# Altium PCB Driver_10kW.PcbDoc (part 1 of 2)
Units mm, origin at the board's own origin, x right, y up, seen from the top; angles counter-clockwise.
Board outline 425.08 x 200.2 mm, 2 copper layers (Top Layer, Bottom Layer); 139 components, 65 nets, 350 pads, 391 vias.
Unrouted connection lines stored in the file: 4.
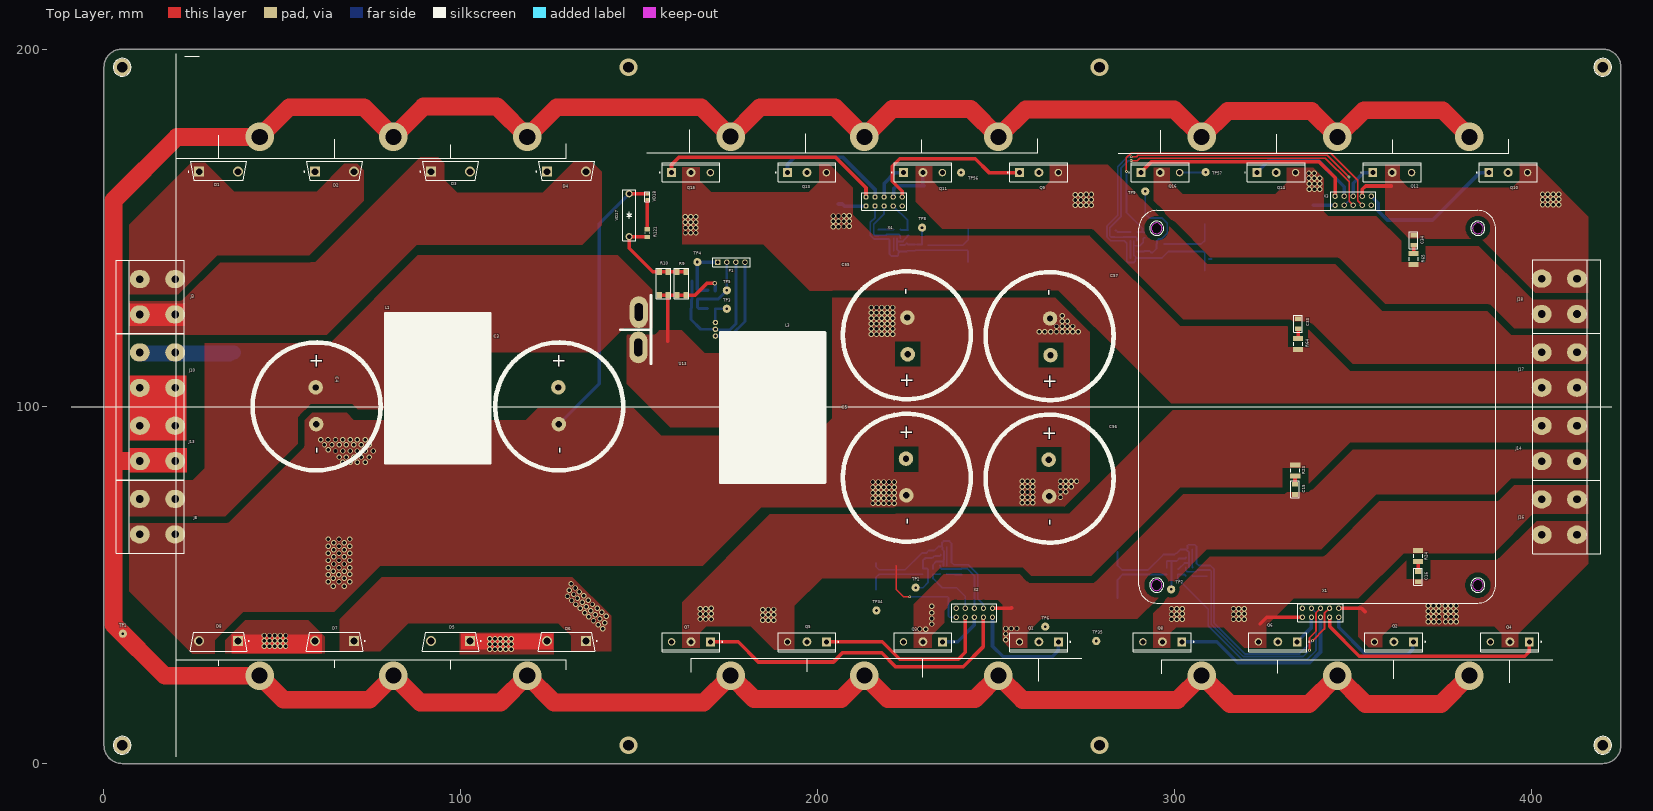
[diagram p0: Top Layer view]
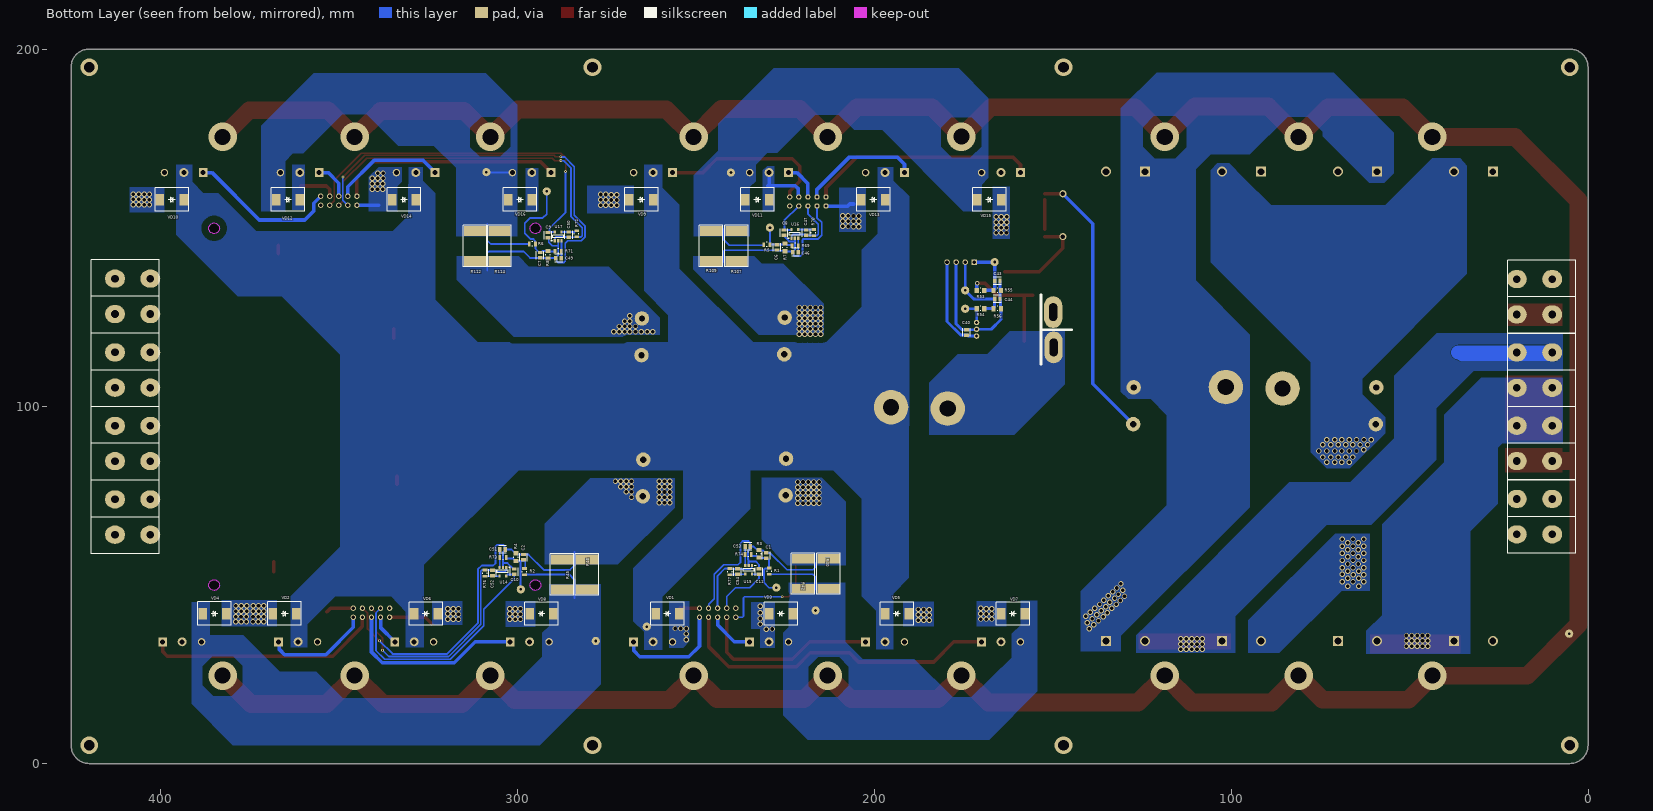
[diagram p1: Bottom Layer view, seen from below]
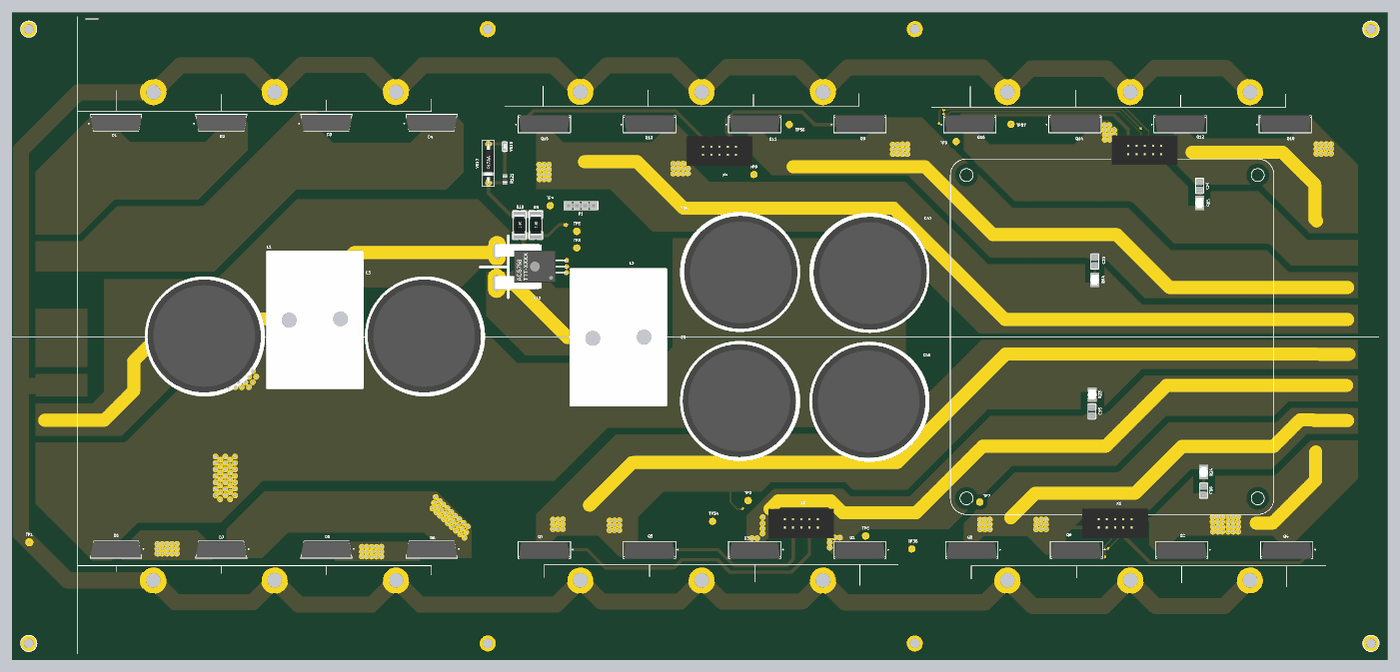
[diagram p3: 3D render of the assembled board from above, using the file's embedded part models]
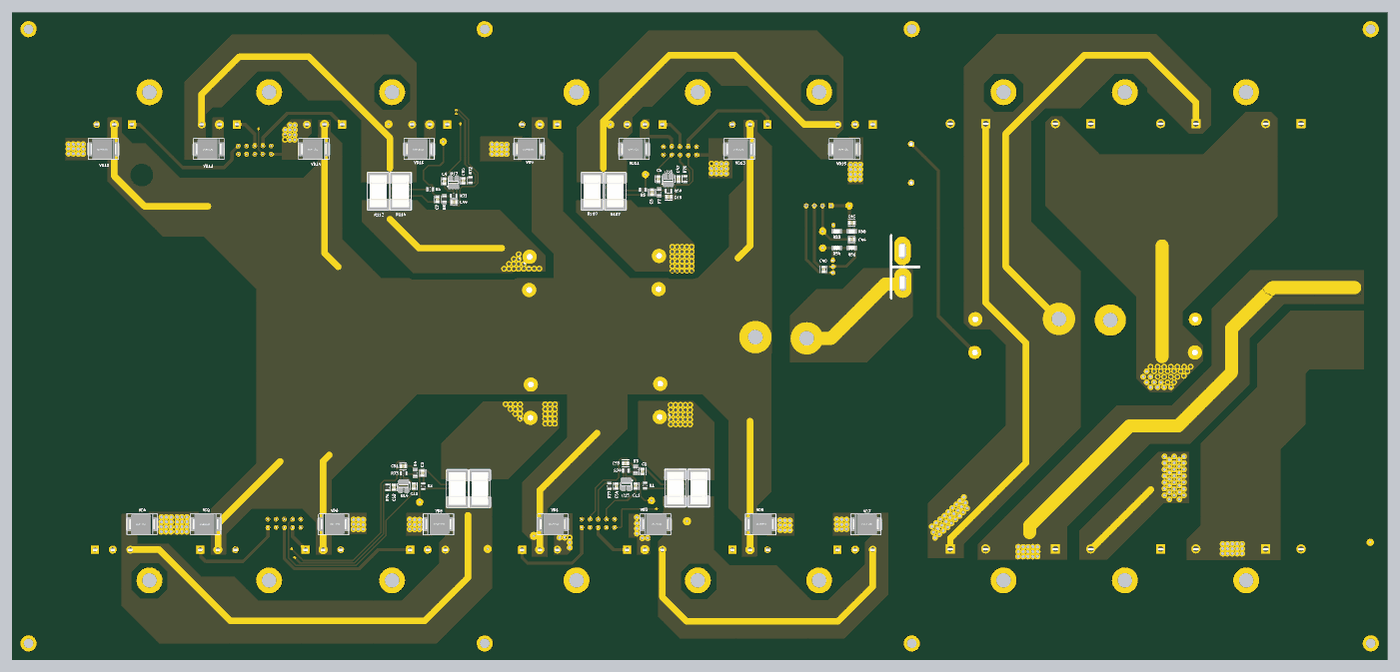
[diagram p4: 3D render of the assembled board from below, using the file's embedded part models]

## Layer stack, top to bottom
Top Solder: solder mask 0.0102, Solder Resist, Dk 3.5
Top Layer: signal copper 0.0356
Dielectric 1: dielectric 0.32, FR-4, Dk 4.8
Bottom Layer: signal copper 0.0356
Bottom Solder: solder mask 0.0102, Solder Resist, Dk 3.5

## Board outline
0.025,5.125 cw(c0.125,5.125) 0.026,5.139 cw(c0.125,5.154) 0.025,5.154 0.025,195.125 cw(c0.125,195.125) 0.025,195.129 cw(c5.125,195.125) 5.096,200.225 cw(c5.1,200.124) 5.1,200.225 5.125,200.225 420.002,200.225 cw(c420.002,200.126) 420.014,200.225 cw(c420.027,200.125) 420.027,200.225 cw(c420,195.125) 425.1,195.125 cw(c425.008,195.125) 425.1,195.122 425.1,5.125 cw(c425.011,5.125) 425.1,5.122 ccw(c423.825,5.124) 425.1,5.125 425.1,5.122 cw(c420,5.125) 420,0.025 cw(c420,0.125) 419.999,0.025 5.128,0.025 cw(c5.125,0.125) 5.125,0.025 cw(c5.125,5.125)
cut-out: 293.5,50 ccw(c295,50) 295,48.5 ccw(c295,50) 296.5,50 ccw(c295,50) 295,51.5 ccw(c295,50)
cut-out: 383.5,50 ccw(c385,50) 385,48.5 ccw(c385,50) 386.5,50 ccw(c385,50) 385,51.5 ccw(c385,50)
cut-out: 383.5,150 ccw(c385,150) 385,148.5 ccw(c385,150) 386.5,150 ccw(c385,150) 385,151.5 ccw(c385,150)
cut-out: 293.5,150 ccw(c295,150) 295,148.5 ccw(c295,150) 296.5,150 ccw(c295,150) 295,151.5 ccw(c295,150)

## Design rules (kind name [scope] priority, off if disabled: settings)
Clearance HV [InNetClass('All Nets') vs InNetClass('HV')] p1: gap=0.4 ignorepadtopadclearanceinfootprint=FALSE except(0: Text-Text Text-Hole; 0.1: Arc-SMDPad Track-SMDPad; 0.2: Arc-Arc Arc-Track Track-Track Via-Via Via-Fill Via-Poly Via-Region Via-Text Via-Hole; 0.3: Arc-THPad Arc-Via Arc-Fill Arc-Poly Arc-Region Arc-Text Arc-Hole Track-THPad Track-Via Track-Fill Track-Poly Track-Region Track-Text Track-Hole; 2: Poly-Poly Poly-Region Poly-Text Poly-Hole)
Clearance Clearance_1 [All] p2: gap=0.1 ignorepadtopadclearanceinfootprint=TRUE except(0.2: SMDPad-SMDPad SMDPad-THPad SMDPad-Via SMDPad-Fill SMDPad-Poly SMDPad-Region SMDPad-Text SMDPad-Hole THPad-THPad THPad-Via THPad-Fill THPad-Poly THPad-Region THPad-Text THPad-Hole; 2: Poly-Poly Poly-Region Poly-Text Poly-Hole)
Clearance GND [InNet('GND')] p3: gap=0.15 ignorepadtopadclearanceinfootprint=TRUE except(0.4: Fill-Fill Fill-Poly Fill-Region Fill-Text Fill-Hole Poly-Poly Poly-Region Poly-Text Poly-Hole Region-Region Region-Text Region-Hole)
ComponentClearance [All] p1: gap=-2.254 collisioncheckmode=3 verticalgap=0.254 showdistances=FALSE
DiffPairsRouting [All] p1: maxlimit=0.254 minlimit=0.1 mostfreqgap=0.254 toplayer_minwidth=0.3 toplayer_maxwidth=2 toplayer_prefwidth=0.3 bottomlayer_minwidth=0.3 bottomlayer_maxwidth=2 bottomlayer_prefwidth=0.3 maxuncoupledlength=12.7
Height [All] p1: minheight=0 maxheight=55.4 prefheight=12.7
HoleSize [All] p1: absolutevalues=TRUE maxlimit=5 minlimit=0.025 maxpercent=80.000 minpercent=20.000
HoleToHoleClearance [All] p1: gap=0 allowstackedmicrovias=TRUE
LayerPairs [All] p1 off: enforce=TRUE
MinimumSolderMaskSliver [All] p1: minsoldermaskwidth=0.01
PasteMaskExpansion [All] p1: expansion=0.5
PlaneClearance [All] p1: clearance=0.1
PlaneConnect [All] p1: planeconnectstyle=Direct reliefexpansion=0.508 reliefentries=4 reliefconductorwidth=0.254 reliefairgap=0.254
PolygonConnect [All] p1: connectstyle=Direct reliefconductorwidth=0.254 reliefentries=4 polygonreliefangle="90 Angle" airgapwidth=0.254
RoutingVias [All] p1: holewidth=0.4 width=0.8 viastyle="Through Hole" minholewidth=0.254 minwidth=0.5 maxholewidth=0.75 maxwidth=1.5
ShortCircuit [All] p1: allowed=TRUE
SilkToSilkClearance [All] p1 off: silktosilkclearance=0.01
SilkToSolderMaskClearance [All] p1: minsilkscreentomaskgap=0 clearancetoexposedcopper=TRUE
SolderMaskExpansion [All] p1: expansion=0.15 istentingtop=FALSE
Width [All] p1: maxlimit=10 minlimit=0.254 preferedwidth=2
17 further rules are at their usual default settings.

## Classes and differential pairs
net class HV: "+350 VDC" NetC15_2 NetC16_2 NetC33_2 NetC34_2 NetJ14_2 NetJ16_2 NetJ17_1 NetJ18_1 NetQ3_3 NetQ4_3 NetQ11_3 NetQ12_3 NetR9_1 V_BAT V_PS

## Components (designator, comment, footprint, x,y, rotation, side; value= is the part's Value field where it differs from the comment)
C1 "C0805C224K5RACTU" FP-C0805C-DN-MFG 230.286,58.327 r90 bottom value="0.22 μF"
C2 "C0805C224K5RACTU" FP-C0805C-DN-MFG 298.293,57.849 r90 bottom value="0.22 μF"
C3 "450V_330uF" CAP_450V_470uF 127.6,100.075 r90 top locked
C4 "450V_330uF" CAP_450V_470uF 59.6,100.075 r90 top locked
C5 "450V_330uF" CAP_450V_470uF 225,80.1 r90 top locked
C6 "C0805C224K5RACTU" FP-C0805C-DN-MFG 227.275,144.677 r270 bottom value="0.22 μF"
C7 "C0805C224K5RACTU" FP-C0805C-DN-MFG 293.65,142.475 r270 bottom value="0.22 μF"
C8 "C0805C224K5RACTU" FP-C0805C-DN-MFG 225.351,148.775 r270 bottom value="0.22 μF"
C9 "C0805C224K5RACTU" FP-C0805C-DN-MFG 291.486,148.075 r270 bottom value="0.22 μF"
C10 "C0805C224K5RACTU" FP-C0805C-DN-MFG 300.925,53.769 r90 bottom value="0.22 μF"
C11 "C0805C224K5RACTU" FP-C0805C-DN-MFG 232.325,53.8 r90 bottom value="0.22 μF"
C15 "CAP-NON-POLAR" CAP-1206 333.775,76.841 r270 top
C16 "CAP-NON-POLAR" CAP-1206 368.275,52.4 r270 top
C33 "CAP-NON-POLAR" CAP-1206 334.65,123.275 r90 top
C34 "CAP-NON-POLAR" CAP-1206 367,146.65 r90 top
C40 "C0805C224K5RACTU" FP-C0805C-DN-MFG 174.201,120.828 r90 bottom value="0.22 μF"
C43 "0.22uF" FP-C0805C-DN-MFG 165.549,135.2 r0 bottom value="0.22 μF"
C44 "0.22uF" FP-C0805C-DN-MFG 165.549,130.15 r0 bottom value="0.22 μF"
C46 "C0805C224K5RACTU" FP-C0805C-DN-MFG 222.089,143.277 r0 bottom value="0.22 μF"
C47 "0.22uF" FP-C0805C-DN-MFG 219.093,148.775 r270 bottom value="0.22 μF"
C49 "C0805C224K5RACTU" FP-C0805C-DN-MFG 288.486,141.626 r0 bottom value="0.22 μF"
C50 "0.22uF" FP-C0805C-DN-MFG 285.627,148.225 r270 bottom value="0.22 μF"
C51 "C0805C224K5RACTU" FP-C0805C-DN-MFG 304.195,60 r180 bottom value="0.22 μF"
C52 "0.22uF" FP-C0805C-DN-MFG 307.044,53.419 r90 bottom value="0.22 μF"
C53 "C0805C224K5RACTU" FP-C0805C-DN-MFG 235.475,60.85 r180 bottom value="0.22 μF"
C54 "0.22uF" FP-C0805C-DN-MFG 238.36,53.8 r90 bottom value="0.22 μF"
C55 "450V_330uF" CAP_450V_470uF 225,120.034 r270 top locked
C56 "450V_330uF" CAP_450V_470uF 265,79.85 r90 top locked
C57 "450V_330uF" CAP_450V_470uF 265,119.775 r270 top locked
D1 "VS-40EPS12-M3" 40EPS08 32.125,166.125 r90 top locked
D2 "VS-40EPS12-M3" 40EPS08 64.625,166.125 r90 top locked
D3 "VS-40EPS12-M3" 40EPS08 97.125,166.125 r90 top locked
D4 "VS-40EPS12-M3" 40EPS08 129.625,166.125 r90 top locked
D5 "VS-40EPS12-M3" 40EPS08 97.125,34.125 r270 top locked
D6 "VS-40EPS12-M3" 40EPS08 129.625,34.125 r270 top locked
D7 "VS-40EPS12-M3" 40EPS08 64.625,34.125 r270 top locked
D8 "VS-40EPS12-M3" 40EPS08 32.125,34.125 r270 top locked
J3 "TL-800" Conn_Tianli_T-800 -19.15,130.803 r270 top locked
J8 "TL-800" Conn_Tianli_T-800 -19.141,69.197 r270 top locked
J10 "TL-800" Conn_Tianli_T-800 -19.15,110.253 r270 top locked
J13 "TL-800" Conn_Tianli_T-800 -19.135,89.722 r270 top locked
J14 "TL-800" Conn_Tianli_T-800 442,89.697 r90 top locked
J16 "TL-800" Conn_Tianli_T-800 442,69.097 r90 top locked
J17 "TL-800" Conn_Tianli_T-800 442,110.278 r90 top locked
J18 "TL-800" Conn_Tianli_T-800 442,130.928 r90 top locked
L1 "Coil" Filtr_drossel 80.799,105 r180 top locked
L3 "Coil" Filtr_drossel 200.151,100 r0 top locked
P1 "TSW-104-08-G-S" SMTC-TSW-104-08-X-S 172.01,140.53 r0 top
Q1 "SPW47N60C3" TO-247 262,34.125 r270 top locked
Q2 "SPW47N60C3" TO-247 361.475,34.125 r270 top locked
Q3 "SPW47N60C3" TO-247 229.5,34.125 r270 top locked
Q4 "SPW47N60C3" TO-247 393.975,34.125 r270 top locked
Q5 "SPW47N60C3" TO-247 197,34.125 r270 top locked
Q6 "SPW47N60C3" TO-247 328.95,34.125 r270 top locked
Q7 "SPW47N60C3" TO-247 164.5,34.125 r270 top locked
Q8 "SPW47N60C3" TO-247 296.6,34.125 r270 top locked
Q9 "SPW47N60C3" TO-247 262,165.625 r90 top locked
Q10 "SPW47N60C3" TO-247 393.5,165.625 r90 top locked
Q11 "SPW47N60C3" TO-247 229.5,165.625 r90 top locked
Q12 "SPW47N60C3" TO-247 361,165.625 r90 top locked
Q13 "SPW47N60C3" TO-247 197,165.625 r90 top locked
Q14 "SPW47N60C3" TO-247 328.5,165.625 r90 top locked
Q15 "SPW47N60C3" TO-247 164.5,165.625 r90 top locked
Q16 "SPW47N60C3" TO-247 296,165.625 r90 top locked
R1 "10K" Yageo_RC0805_IPC_C 229.436,53.95 r270 bottom
R2 "10K" Yageo_RC0805_IPC_C 298.023,53.769 r270 bottom
R3 "1K" Yageo_RC0805_IPC_A 232.335,58.827 r270 bottom
R4 "1K" Yageo_RC0805_IPC_A 300.425,57.85 r270 bottom
R5 "10K" Yageo_RC0805_IPC_C 230.147,145.427 r0 bottom
R6 "10K" Yageo_RC0805_IPC_C 295.833,145.6 r0 bottom
R7 "1K" Yageo_RC0805_IPC_A 225.051,144.627 r90 bottom
R8 "1K" Yageo_RC0805_IPC_A 291.45,142.6 r90 bottom
R9 "47K" RES-2512 161.85,134.55 r270 top
R10 "47K" RES-2512 156.825,134.55 r270 top
R23 "10K" FP-CRCW1210-e3-IPC_A 333.837,82.089 r270 top
R24 "10K" FP-CRCW1210-e3-IPC_A 368.275,58.15 r270 top
R40 "RES-CONST" RES-3921 212.8,53.2 r270 bottom locked
R42 "RES-CONST" RES-3921 220,53.2 r270 bottom
R45 "RES-CONST" RES-3921 287.5,53 r270 bottom locked
R46 "RES-CONST" RES-3921 280.5,53 r270 bottom locked
R53 "470K" Vishay_CRCW0805-e3_IPC_A 170.225,132.571 r0 bottom
R54 "10K" Vishay_CRCW0805-e3_IPC_A 170.225,127.488 r0 bottom
R55 "2.2K" Vishay_CRCW0805-e3_IPC_A 165.549,132.571 r0 bottom
R56 "2.2K" Vishay_CRCW0805-e3_IPC_A 165.549,127.488 r0 bottom
R64 "10K" FP-CRCW1210-e3-IPC_A 334.65,117.587 r90 top
R65 "10K" FP-CRCW1210-e3-IPC_A 367,141.375 r90 top
R69 "10K" Yageo_RC0805_IPC_C 222.212,145.125 r0 bottom
R70 "10K" Yageo_RC0805_IPC_C 217.023,148.775 r90 bottom
R71 "10K" Yageo_RC0805_IPC_C 288.609,143.601 r0 bottom
R72 "10K" Yageo_RC0805_IPC_C 283.414,148.475 r90 bottom
R73 "10K" Yageo_RC0805_IPC_C 304.069,57.769 r180 bottom
R74 "10K" Yageo_RC0805_IPC_C 235.374,58.6 r180 bottom
R76 "10K" Yageo_RC0805_IPC_C 309.094,53.369 r270 bottom
R77 "10K" Yageo_RC0805_IPC_C 240.46,53.8 r270 bottom
R107 "RES-CONST" RES-3921 238.65,145 r90 bottom locked
R109 "RES-CONST" RES-3921 245.8,145 r90 bottom locked
R112 "RES-CONST" RES-3921 311.925,145 r90 bottom locked
R114 "RES-CONST" RES-3921 305,145 r90 bottom
R121 "2K" Yageo_RC0805_IPC_A 152.3,148.675 r270 top
TP1 "Test_Point_PCB" Test_Point#1 5.3,36.4 r0 top
TP2 "Test_Point_PCB" Test_Point#2 227.475,49.3 r0 top
TP3 "Test_Point_PCB" Test_Point#1 174.55,127.449 r0 top
TP4 "Test_Point_PCB" Test_Point#1 166.299,140.53 r0 top
TP5 "Test_Point_PCB" Test_Point#1 174.55,132.614 r0 top
TP6 "Test_Point_PCB" Test_Point#1 263.79,38.378 r0 top
TP7 "Test_Point_PCB" Test_Point#1 299.074,48.835 r0 top
TP8 "Test_Point_PCB" Test_Point#1 229.271,150.175 r0 top
TP9 "Test_Point_PCB" Test_Point#1 291.81,160.35 r0 top
TP34 "Test_Point_PCB" Test_Point#1 216.475,42.9 r90 top
TP35 "Test_Point_PCB" Test_Point#1 278.075,34.35 r90 top
TP56 "Test_Point_PCB" Test_Point#1 240.2,165.625 r90 top
TP57 "Test_Point_PCB" Test_Point#1 308.725,165.725 r90 top
U13 "ACS758" ACS758-100 161.575,121.825 r90 top
U14 "MCP6001" SOT-23-5 304.073,53.769 r270 bottom
U15 "MCP6001" SOT-23-5 235.24,54.3 r270 bottom
U16 "MCP6001" SOT-23-5 222.273,148.425 r90 bottom
U17 "MCP6001" SOT-23-5 288.611,147.725 r90 bottom
VD1 "DIODE" DO-214AB 258,42 r180 bottom
VD2 "DIODE" DO-214AB 365.25,42 r0 bottom locked
VD3 "DIODE" DO-214AB 226.2,42 r180 bottom locked
VD4 "DIODE" DO-214AB 384.9,42 r0 bottom locked
VD5 "DIODE" DO-214AB 193.7,42 r180 bottom locked
VD6 "DIODE" DO-214AB 325.7,42 r180 bottom locked
VD7 "DIODE" DO-214AB 161.2,42 r180 bottom locked
VD8 "DIODE" DO-214AB 293.3,42 r180 bottom locked
VD9 "DIODE" DO-214AB 265.3,158 r0 bottom locked
VD10 "DIODE" DO-214AB 396.85,158 r0 bottom locked
VD11 "DIODE" DO-214AB 232.8,158 r0 bottom locked
VD12 "DIODE" DO-214AB 364.3,158 r0 bottom locked
VD13 "DIODE" DO-214AB 200.3,158 r0 bottom locked
VD14 "DIODE" DO-214AB 331.8,158 r0 bottom locked
VD15 "DIODE" DO-214AB 167.8,158 r0 bottom locked
VD16 "DIODE" DO-214AB 299.3,158 r0 bottom locked
VD17 "15V" DO-017AA 147.175,153.675 r90 top
VD18 "LED" LED-0603 152.25,158.825 r270 top
X1 "BH-10" BH-10 346,41 r180 top locked
X2 "BH-10" BH-10 249,41 r180 top locked
X3 "BH-10" BH-10 345,159 r0 top locked
X4 "BH-10" BH-10 213.555,158.775 r0 top

## Footprints (in the part's own frame and the unit in brackets; to place one, negate y for a bottom-side part, rotate by r counter-clockwise, add the part's x,y. Pads: shape width x height; smd on the part's side, far side on the other; paste and mask are expansions set on the pad)
40EPS08 [mm]
  rect 2.8x2.8 hole 1.85 paste-1000 mask+0: 1(-0.228,5.46)
  round 2.8 hole 1.85 paste-1000 mask+0: 3(-0.228,-5.46)
  silkscreen extent -2.66,-7.94 2.66,8.56, body extent -2.49,-7.79 2.49,7.79, height 27.53
ACS758-100 [mil]
  round 60 hole 30: 1(-80,-385) 2(-5,-385) 3(70,-385)
  oval 350x200 hole 90 slot 195 at 0 deg: 4(185,460) 5(-205,465)
  silkscreen extent -385,325 370,665, body extent -281,-404 271,492, height 280
BH-10 [mm]
  round 1.5 hole 0.9: 1(0,0) 2(2.54,0) 3(5.08,0) 4(7.62,0) 5(10.16,0) 6(0,-2.54) 7(2.54,-2.54) 8(5.08,-2.54) 9(7.62,-2.54) 10(10.16,-2.54)
  silkscreen extent -1.25,-3.75 11.41,1.25, body extent -5.07,-5.82 15.23,3.28, height 9
CAP-1206 [mm]
  rect 1.3x1.8 smd: 1(-1.425,0) 2(1.425,0)
  silkscreen extent -2.37,-1.2 2.37,1.2, body extent -1.68,-0.87 1.67,0.87, height 0.95
CAP_450V_470uF [mil]
  round 160 hole 70: 1(-195,5) 2(210,10)
  silkscreen extent -706,-706 706,705, body extent -684,-679 698,703, height 2044
Conn_Tianli_T-800 [mil]
  oval 200x220 hole 85: 1(-195,1540) 1(-195,1150) 2(195,1540) 2(195,1150)
  silkscreen extent -405,890 405,1640, body extent -404,895 404,1637, height 1211
DO-017AA [mm]
  round 2 hole 1.3: 1(-6,0) 2(6,0)
  silkscreen extent -7.2,-1.85 7.15,1.83, body extent -6.63,-1.7 6.37,1.7, height 3.4
DO-214AB [mm]
  rect 2.4x3.3 smd: 1(-3.3,0) 2(3.35,0)
  silkscreen extent -4.7,-3.3 4.7,3.2, body extent -4.06,-3.15 4.06,3.15, height 2.67
Filtr_drossel [mil]
  round 380 hole 180: 1(-815,-20) 2(-190,-5)
  silkscreen extent -1080,-835 75,820, body extent -923,-727 -97,707, height 1534
FP-C0805C-DN-MFG [mm]
  rect 0.95x1.35 smd paste+0 mask+0: 1(-0.75,0) 2(0.75,0)
  silkscreen extent -1.1,-1.07 1.1,1.07, body extent -1,-0.63 1,0.63, height 0.88
FP-CRCW1210-e3-IPC_A [mm]
  rect 1.405x2.806 smd paste+0 mask+0: 1(-1.551,0) 2(1.551,0)
  silkscreen extent -0.47,-1.25 0.47,1.25, body extent -2.75,-1.9 2.75,1.9, height 0.25
LED-0603 [mm]
  rect 0.85x0.9 smd: 1(-0.775,0) 2(0.775,0)
  silkscreen extent -1.43,-0.67 1.45,0.67, body extent -0.82,-0.36 0.83,0.36, height 0.68
RES-2512 [mm]
  rect 1.8x1.45 smd: 1(-3.275,-1.225) 1(-3.275,1.225) 2(3.275,-1.225) 2(3.275,1.225)
  silkscreen extent -4.28,-2.05 4.25,2.05, body extent -3.2,-1.6 3.2,1.6, height 0.6
RES-3921 [mm]
  rect 2.75x6.2 smd: 1(-4.2,0) 2(4.2,0)
  silkscreen extent -5.8,-3.3 5.8,3.3, body extent -5,-2.6 5,2.6, height 0.83
SMTC-TSW-104-08-X-S [mm] ".025 SQ Post Terminal Strip Assembly, 1x4 Pins, Vertical, 2.54mm Pitch, Male"
  rect 1.55x1.55 hole 1.02: 1(0,0)
  round 1.55 hole 1.02: 2(2.54,0) 3(5.08,0) 4(7.62,0)
  silkscreen extent -1.46,-1.27 9.08,1.27, body extent -1.27,-1.27 8.89,1.27, height 8.38
SOT-23-5 [mm]
  rect 0.9x0.65 smd: 1(-1.2,0.95) 2(-1.2,0) 3(-1.2,-0.95) 4(1.2,-0.95) 5(1.2,0.95)
  silkscreen extent -1.32,-1.55 0.35,1.95, body extent -1.4,-1.45 1.4,1.45, height 1.24
Test_Point#1 [mil]
  round 90 hole 30 paste+4 mask+4: 1(0,0)
Test_Point#2 [mil]
  round 90 hole 30 paste+19.68 mask+4: 1(0,0)
TO-247 [mm] "FM, 3-Leads, Body 5.02x15.94mm, Pitch 5.44mm"
  rect 2.5x2.5 hole 1.4: 1(0,5.44)
  round 2.5 hole 1.4: 2(0,0)
  round 2.1 hole 1.4: 3(0,-5.44)
  silkscreen extent -2.56,-8.1 2.75,8.88, body extent -2.21,-7.75 2.79,7.75, height 32.07
Vishay_CRCW0805-e3_IPC_A [mil]
  rect 47.5x59.38 smd paste+0 mask+0: 1(-41.37,0) 2(41.37,0)
  silkscreen extent -3,-25 3,25, body extent -39,-25 39,25, height 20
Yageo_RC0805_IPC_A [mm]
  rect 1.157x1.508 smd paste+0 mask+0: 1(-1.076,0) 2(1.076,0)
  silkscreen extent -0.12,-0.63 0.12,0.63, body extent -1,-0.62 1,0.63, height 0.6
Yageo_RC0805_IPC_C [mm]
  rect 0.757x1.308 smd paste+0 mask+0: 1(-0.876,0) 2(0.876,0)
  silkscreen extent -0.12,-0.63 0.12,0.63, body extent -1,-0.62 1,0.63, height 0.6

## Part data
C1 C2 C6 C7 C8 C9 C10 C11 C40 C46 C49 C51 C53: library part CMP-1036-04552-2, "CAP CER 0.22UF 50V X7R 0805", Capacitance="0.22 μF", Manufacturer=KEMET, Package=C0805C-DN, Temperature="-55°C to +125°C", Temperature Characteristic=X7R, Temperature Coefficient=30ppm/°C, Temperature Range High=+125°C, Temperature Range Low=-55°C, Tolerance=0.1, Voltage Rating="50 V", Automotive=No, Category=Cap, ComponentLink2Description=Datasheet, ComponentLink2URL=https://content.kemet.com/datasheets/KEM_C1003_C0G_SMD.pdf, Device Class L1="Passive Components", Device Class L2=Capacitors, Device Class L3="Ceramic Capacitors", Digikey Description="CAP CER 0.22UF 50V X7R 0805", Height=0.88mm, Ipc Land Pattern Name=CAPC200125X78, Lead Free=Yes, Manufacturer Part Number=C0805C224K5RACTU, Material=Ceramic, Mouser Description="CAP CER 0.22UF 50V X7R 0805", Octopart=https://octopart.com/c0805c224k5ractu-kemet-144670, RoHS=TRUE
C3 C4 C5 C55 C56 C57: library part CAP_450V_330uF
C43 C44 C47 C50 C52 C54: library part CMP-1036-04552-2, "CAP CER 0.22UF 50V X7R 0805", Capacitance="0.22 μF", Manufacturer=KEMET, Manufacturer Part Number=C0805C224K5RACTU, Package=C0805C-DN, Temperature="-55°C to +125°C", Temperature Characteristic=X7R, Temperature Coefficient=30ppm/°C, Temperature Range High=+125°C, Temperature Range Low=-55°C, Tolerance=0.1, Voltage Rating="50 V", Automotive=No, Category=Cap, ComponentLink2Description=Datasheet, ComponentLink2URL=https://content.kemet.com/datasheets/KEM_C1003_C0G_SMD.pdf, Device Class L1="Passive Components", Device Class L2=Capacitors, Device Class L3="Ceramic Capacitors", Digikey Description="CAP CER 0.22UF 50V X7R 0805", Height=0.88mm, Ipc Land Pattern Name=CAPC200125X78, Lead Free=Yes, Material=Ceramic, Mouser Description="CAP CER 0.22UF 50V X7R 0805", Octopart=https://octopart.com/c0805c224k5ractu-kemet-144670, RoHS=TRUE
D1 D2 D3 D4 D5 D6 D7 D8: library part VS-40EPS12, "DIODE GP 1.2KV 40A TO247AC", Average Rectified Current=40A, Case/Package=TO-247-2, Max Reverse Voltage (DC)=1.2kV, Mount="Through Hole", Packaging=Rail/Tube, RoHS Compliant=Yes, Series=-
J3 J8 J10 J13 J14 J16 J17 J18: library part Connector_Tianli_T-800
P1: library part CMP-1024-00357-1, "0.025\" SQ Post Header, Through-hole, Vertical, -55 to 125 degC, 2.54 mm Pitch, 4-Pin, Male, RoHS", Manufacturer=Samtec, Temperature Range="-55 to 125 degC", ComponentLink1Description="Manufacturer URL", ComponentLink1URL=http://www.samtec.com, ComponentLink2Description=Datasheet, ComponentLink2URL=http://www.samtec.com/documents/webfiles/pdf/TSW_TH.PDF, ComponentLink3Description="Package Specification", ComponentLink3URL=http://www.samtec.com/documents/webfiles/cpdf/TSW-XXX-XX-XXX-X-XX-XXX-MKT.pdf, DatasheetVersion=F-214, Mounting Technology=Through-hole, Orientation=Vertical, PackageDescription=".025[0.64] SQ. Post Terminal Strip Assembly", PackageReference=TSW-104-08-X-S, PackageVersion="DM, 8/1988", PartNumber=TSW-104-08-G-S, Pitch="2.54 mm", RoHS=True
Q1 Q2 Q3 Q4 Q5 Q6 Q7 Q8 Q9 Q10 Q11 Q12 Q13 Q14 Q15 Q16: "N-Channel CoolMOS Power-Transistor, 600 V VDS, 47 A ID, -55 to 150 degC, PG-TO247-3-44, Tube, Green", Manufacturer=Infineon, ComponentLink1Description="Manufacturer URL", ComponentLink1URL=http://www.infineon.com/, ComponentLink2Description=Datasheet, ComponentLink2URL=http://www.infineon.com/dgdl/SPW47N60C3_Rev%5B1%5D.2.6_PCN.pdf?folderId=db3a304412b407950112b408e8c90004&fileId=db3a304412b407950112b42dff93492f, ComponentLink3Description="Package Specification", ComponentLink3URL=http://www.infineon.com/cms/packages/Leaded_and_through-hole/P-PG-TO247/P-PG-TO247-3-44.html?__locale=en, DatasheetVersion="Rev. 2.6", Green=TRUE, Halogen-free=available, ID (max)="47Â A", IDpuls (max)="141Â A", Mounting Technology="Through Hole", PackageDescription="3-Pin Plastic (Green) Transistor Single Outline Package, 15.94 x 20.95 mm Body, 5.44 mm Pitch", PackageReference=PG-TO247-3-44, PackageVersion="Rev. 03", Packing=Tube, PartNumber=SPW47N60C3, Polarity=N, Ptot (max)="415Â W", QG="252Â nC", RDS (on) (max)="70Â mOhm", Rth="0.3Â K/W", RthJA (max)="62Â K/W", RthJC (max)="0.3Â K/W", Technology="CoolMOS C3", VDS (max)="600Â V", VGS(th) (max)="3.9Â V", VGS(th) (min)="2.1Â V"
R1 R2 R3 R4 R5 R6 R7 R8 R53 R54 R55 R56 R69 R70 R71 R72 R73 R74 R76 R77: library part RC0805FR-07100KL
R9 R10: library part RES-CONST
R23 R24 R64 R65: library part CMP-2005-01987-2, "RES SMD 10K OHM 1% 1/2W 1992", Case Code (Imperial)=1210, Case Code (Metric)=3225, Max Operating Temperature=155°C, Max Power Dissipation=500mW, Min Operating Temperature=-55°C, Package Quantity=1, Resistance=0mR, Temperature Coefficient=0ppm/°C, Voltage Rating=200V, Case/Package=1210, Composition="Thick Film", Contact Plating=Tin, Depth=2.5mm, Features="Automotive AEC-Q200", Height=0.55mm, Length=3.2mm, Military Standard=Not, Mount="Surface Mount", Number of Terminations=2, Packaging="Tape and Reel", Power Rating=500mW, Radiation Hardening=No, REACH SVHC="No SVHC", Termination=SMD/SMT, Weight=0.000564oz, Width=0.098inch
R121: library part RC0805FR-07100KL, "220"
TP1 TP2 TP3 TP4 TP5 TP6 TP7 TP8 TP9 TP34 TP35 TP56 TP57: library part TP_PCB?, "Test_Point"
U14 U15 U16 U17: library part MCP6001T
VD17: library part ZENER

## Via types
v1: diameter 1.5, hole 1, Top Layer to Bottom Layer, 357 vias
v2: diameter 8, hole 4.5, Top Layer to Bottom Layer, 18 vias
v3: diameter 5, hole 3, Top Layer to Bottom Layer, 8 vias
v4: diameter 0.8, hole 0.3, Top Layer to Bottom Layer, 7 vias
v5: diameter 1.27, hole 0.711, Top Layer to Bottom Layer, 1 vias

## Nets (pads, with @x,y where several pads share a name; then routed paths per layer and width w, separated by ;. In a path a pad name is that pad's centre, name@x,y a point inside that pad or via, vN(x,y) a via of type N, cw(c..) or ccw(c..) an arc to the next point about the centre after c; other vN are vias at no path point)
+3V3: C8.1 C9.1 C10.1 C11.1 U14.5 U15.5 U16.5 U17.5 X1.9 X2.9 X3.9 X4.9 | length 196.6
  Top Layer w0.4: v4(286.525,165.919) 286.525,169.7 287.835,171.01 343.815,171.01 351.32,163.505 351.32,157.76 X3.9@352.62,156.46
  Bottom Layer w0.5: X4.9@221.175,156.235 225.2,152.21 225.2,149.676 C8.1@225.351,149.525 ; U16.5@223.223,149.625 223.223,149.6 223.298,149.525 C8.1@225.2,149.525 ; U15.5@234.29,53.1 234.265,53.075 232.35,53.075 C11.1@232.325,53.05 232.325,51.9 234.925,49.3 238.9,49.3 241.38,46.82 X2.9@241.38,43.54 ; v4(286.525,165.919) 286.525,154.485 291.068,149.942 291.068,149.05 291.253,149.05 291.478,148.825 C9.1@291.486,148.825 ; U17.5@289.561,148.925 C9.1@291.21,148.925 ; U14.5@303.123,52.569 303.123,52.694 302.798,53.019 C10.1@300.925,53.019 300.925,51.825 309.475,43.275 309.475,38.625 318.85,29.25 337.225,29.25 339.65,31.675 339.65,42.27 X1.9@338.38,43.54
+5V: C40.1 P1.4 U13.1 | length 26.9
  Bottom Layer w0.8: U13.1@171.354,119.793 173.791,119.793 174.001,120.003 174.201,120.003 C40.1@174.239,120.04 ; C40.1@174.201,120.078 175.778,120.078 179.6,123.9 179.6,140.67 P1.4@179.63,140.7
  Bottom Layer w1: C40.1@174.051,120.078 C40.1@174.201,120.078
"+350 VDC": C4.2 J8.1 L1.2 U13.4
GND: C1.2 C2.2 C3.1 C4.1 C5.1 C6.2 C7.2 C8.2 C9.2 C10.2 C11.2 C40.2 C43.1 C44.1 C46.2 C49.2 C51.2 C53.2 C55.1 C56.1 C57.1 D1.3 D3.3 D5.3 D8.3 J8.2 P1.3 R3.1 R4.1 R7.1 R8.1 R40.1 R42.1 R45.1 R46.1 R55.1 R56.1 R107.1 R109.1 R112.1 R114.1 U13.2 U14.2 U15.2 U16.2 U17.2 VD17.2 VD18.1 X1.7 X2.7 X3.7 X4.7 | length 491.4
  Top Layer w0.4: v4(287.876,170.061) 287.89,170.075 289.394,170.075 289.744,170.425 342.805,170.425 v4(348.9,164.33)
  Top Layer w0.5: VD17.2@147.175,159.675 VD17.2@147.213,159.638 ; VD18.1@152.212,159.638 VD18.1@152.25,159.6 ; v4(338.7,34.425) 342.02,37.745 342.02,42.1 X1.7@343.46,43.54
  Top Layer w1: VD17.2@147.213,159.638 VD18.1@152.212,159.638
  Bottom Layer w0.4: X3.7@347.54,156.46 348.9,157.82 v4(348.9,164.33)
  Bottom Layer w0.5: X4.7@216.095,156.235 216.095,152.995 214.75,151.65 214.75,148.025 215.749,147.026 219.875,147.026 220.168,146.733 220.168,142.727 220.693,142.202 222.308,142.202 222.601,142.495 222.601,142.559 222.614,142.573 222.614,143.052 C46.2@222.839,143.277 ; 216.35,56.176 216.35,55.157 217.207,54.3 224.476,54.3 229.164,58.988 230.396,58.988 231.127,59.719 232.694,59.719 232.829,59.854 233.793,60.818 C53.2@234.557,60.818 ; U16.2@222.273,147.225 222.273,146.282 ; R7.1@225.051,143.552 224.977,143.477 222.839,143.477 222.614,143.702 222.566,143.702 222.273,143.995 222.273,146.282 ; R7.1@225.051,143.725 227.275,143.725 C6.2@227.477,143.927 ; C8.2@225.551,148.025 C8.2@225.351,148.025 225.126,147.8 225.126,147.6 224.157,146.632 224.152,146.632 223.802,146.282 222.273,146.282 ; C6.2@227.477,143.827 241.882,143.827 242.175,143.534 242.175,140.5 ; C11.2@232.325,54.55 232.325,55.688 233.295,56.659 235.24,56.659 ; U15.2@235.24,55.5 235.24,56.659 ; X2.7@246.46,43.54 246.399,43.601 246.399,44.601 244.85,46.15 244.85,53.075 242.226,55.699 238.201,55.699 237.51,56.39 237.51,61.765 236.925,62.35 235.293,62.35 234.864,61.921 234.864,60.989 C53.2@234.725,60.85 234.95,60.625 234.95,60.077 235.414,59.612 235.414,57.225 235.24,57.051 235.24,56.659 ; 284.025,59.35 284.025,55.525 285.283,54.267 292.617,54.267 296.949,58.599 C2.2@298.293,58.599 300.098,58.599 R4.1@300.425,58.926 ; v4(287.876,170.061) 287.819,170.004 286.829,170.004 284.075,167.25 284.075,153.65 281.05,150.625 281.05,147.625 282.15,146.525 285.929,146.525 286.642,145.811 286.642,140.801 286.998,140.446 288.656,140.446 289.011,140.801 289.011,141.401 C49.2@289.236,141.626 ; U17.2@288.611,146.525 288.611,145.082 ; C9.2@291.725,147.325 C9.2@291.486,147.325 291.466,147.325 291.241,147.1 291.241,146.048 290.276,145.082 288.611,145.082 ; R4.1@300.601,58.926 300.929,59.254 301.675,60 C51.2@303.445,60 ; C10.2@300.925,54.519 301.125,54.519 301.35,54.744 302.802,56.196 304.073,56.196 ; U14.2@304.073,54.969 304.073,56.196 ; 308.45,138.2 308.45,143.125 308.075,143.5 298.258,143.5 296.766,142.008 296.473,141.716 289.236,141.716 289.236,141.826 288.611,142.451 288.611,145.082 ; R112.1@309.633,141.367 R112.1@310.424,141.367 ; v4(338.7,34.425) 335,30.725 319.725,30.725 311.1,39.35 311.1,54.45 310.031,55.519 306.824,55.519 306.15,56.194 306.15,60.9 305.725,61.325 303.917,61.325 303.624,61.032 303.624,60.179 C51.2@303.445,60 ; C51.2@303.445,60 303.445,59.8 303.67,59.575 303.78,59.575 304.073,59.282 304.073,56.196
  Bottom Layer w0.8: C43.1@164.799,135.2 C44.1@164.799,130.15 164.649,130 164.649,127.638 R56.1@164.498,127.488 164.498,124.452 167.252,121.698 U13.2@171.354,121.698 ; U13.2@171.433,121.578 C40.2@174.201,121.578 174.212,121.588 175.438,121.588 177.09,123.24 P1.3@177.09,140.7
  Bottom Layer w1: C3.1@127.473,95.122 138.775,106.424 138.775,151.275 VD17.2@147.175,159.675
  other v1: 64.263,49.7 67.375,49.7 62.875,50.925 65.875,50.925 68.875,50.925 64.25,51.925 67.375,51.925 62.875,52.876 65.845,52.876 68.875,53.014 64.263,53.925 67.375,53.925 62.875,54.925 65.875,54.925 68.875,54.925 64.375,55.925 67.375,55.925 62.875,56.925 65.875,56.925 68.875,56.925 64.375,57.925 67.375,57.925 62.875,58.925 65.875,58.925 68.875,58.925 64.375,59.925 67.375,59.925 62.875,60.925 65.875,60.925 68.875,60.925 64.375,61.925 67.375,61.925 62.875,62.925 65.875,62.925 68.875,62.925 215.5,72.9 217,72.9 218.5,72.9 220,72.9 221.5,72.9 257.3,73.1 258.8,73.1 260.3,73.1 215.5,74.4 217,74.4 218.5,74.4 220,74.4 221.5,74.4 257.3,74.6 258.8,74.6 260.3,74.6 268.05,74.625 215.5,75.9 217,75.9 218.5,75.9 220,75.9 221.5,75.9 257.3,76.1 258.8,76.1 260.3,76.1 268.05,76.125 269.55,76.125 215.5,77.4 217,77.4 218.5,77.4 220,77.4 221.5,77.4 257.3,77.6 258.8,77.6 260.3,77.6 268.05,77.625 269.55,77.625 271.05,77.625 215.5,78.9 217,78.9 218.5,78.9 220,78.9 221.5,78.9 257.3,79.1 258.8,79.1 260.3,79.1 268.05,79.125 269.55,79.125 271.05,79.125 272.55,79.125 66.9,84.4 69,84.4 71,84.4 73.2,84.4 65.9,85.9 67.9,85.9 70,85.9 72.1,85.9 74.4,85.9 64.9,87.6 66.9,87.6 69,87.6 71,87.6 73.2,87.6 75.45,87.6 62.9,87.9 61.8,89.3 63.9,89.3 65.9,89.3 67.9,89.3 70,89.3 72.1,89.3 74.4,89.3 60.8,90.7 62.8,90.7 64.9,90.7 66.9,90.7 69,90.7 71,90.7 73.2,90.7 215,120.3 216.5,120.3 218,120.3 219.5,120.3 221,120.3 268.5,121 270,121 271.5,121 273,121 262.125,121.025 263.69,121.025 265.35,121.025 266.925,121.025 215,121.8 216.5,121.8 218,121.8 219.5,121.8 221,121.8 266.925,122.5 268.5,122.5 270,122.5 271.5,122.5 215,123.3 216.5,123.3 218,123.3 219.5,123.3 221,123.3 268.5,124 270,124 215,124.8 216.5,124.8 218,124.8 219.5,124.8 221,124.8 268.5,125.5 215,126.3 216.5,126.3 218,126.3 219.5,126.3 221,126.3 215,127.8 216.5,127.8 218,127.8 219.5,127.8 221,127.8
GND_1: J13.2 TP1.1 | length 1009.5
  Top Layer w5: J13.2@19.981,84.769 J13.2@10.075,84.769 10.06,84.754 2.7,84.754 ; v2(382.625,24.625) 374.7,16.7 353.55,16.7 v2(345.625,24.625) 337.7,16.7 315.55,16.7 v2(307.625,24.625) 300.8,17.8 257.45,17.8 v2(250.625,24.625) 244.1,18.1 219.65,18.1 v2(213.125,24.625) 206.6,18.1 182.15,18.1 v2(175.625,24.625) 168.1,17.1 126.15,17.1 v2(118.625,24.625) 111.1,17.1 88.65,17.1 v2(81.125,24.625) 74.4,17.9 50.35,17.9 v2(43.625,24.625) 17.075,24.625 2.7,39 2.7,84.754 ; v2(382.625,175.625) 375.15,183.1 353.1,183.1 v2(345.625,175.625) 338.35,182.9 314.9,182.9 v2(307.625,175.625) 299.95,183.3 258.3,183.3 v2(250.625,175.625) 242.85,183.4 220.9,183.4 v2(213.125,175.625) 204.85,183.9 183.85,183.9 v2(175.625,175.675) 167.4,183.9 126.9,183.9 v2(118.625,175.625) 110.15,184.1 89.6,184.1 v2(81.125,175.625) 72.85,183.9 51.95,183.9 v2(43.675,175.625) 20.525,175.625 2.7,157.8 2.7,84.754
NetC1_1: C1.1 R1.1 R3.2 R74.2 TP2.1 | length 17.3
  Bottom Layer w0.5: TP2.1@227.475,49.3 229.525,49.3 230.911,50.686 230.911,54.405 230.618,54.698 229.564,54.698 R1.1@229.436,54.826 ; R1.1@229.561,54.791 229.561,57.059 229.853,57.352 230.061,57.352 C1.1@230.286,57.577 ; C1.1@230.086,57.577 C1.1@230.286,57.577 ; R3.2@232.122,57.577 C1.1@230.286,57.577 ; R3.2@232.335,57.752 232.664,58.08 233.016,58.08 233.132,58.196 234.37,58.196 234.498,58.324 R74.2@234.498,58.6
NetC2_1: C2.1 R2.1 R4.2 R73.2 TP7.1 | length 15.9
  Bottom Layer w0.5: R2.1@297.853,54.773 297.853,56.797 299.143,56.797 ; TP7.1@299.074,48.835 299.143,48.904 299.143,56.797 ; R4.2@300.425,56.774 300.601,56.774 301.32,57.494 303.065,57.494 303.193,57.622 R73.2@303.193,57.769 ; R4.2@300.425,56.797 299.143,56.797
NetC3_2: C3.2 D2.1 D4.1 D6.1 D7.1 L1.1
  other v1: 139.8,37.8 138.5,38.9 140.3,39.5 137.2,40 139,40.6 135.9,41.1 140.8,41.3 137.7,41.7 134.7,42.3 139.5,42.4 136.4,42.8 133.5,43.5 138.2,43.5 135.2,44 132.2,44.6 136.9,44.6 134,45.2 131.1,45.7 135.7,45.8 132.7,46.3 129.9,46.9 134.5,47 131.6,47.4 133.2,48.1 130.4,48.6 132.1,49.2 130.9,50.4
NetC6_1: C6.1 R5.1 R7.2 R69.2 TP8.1 | length 10.6
  Bottom Layer w0.5: R69.2@223.088,145.3 224.472,145.3 224.875,145.703 R7.2@225.051,145.703 225.327,145.427 C6.1@227.275,145.427 ; C6.1@227.81,145.427 R5.1@229.148,145.427 ; R5.1@229.271,145.427 TP8.1@229.271,150.175
NetC7_1: C7.1 R6.1 R8.2 R71.2 TP9.1 | length 28.2
  Bottom Layer w0.5: R71.2@289.57,143.475 R8.2@291.45,143.475 ; R8.2@291.45,143.676 292.999,143.676 293.45,143.225 C7.1@293.65,143.225 ; TP9.1@291.81,160.35 291.81,153.99 292.9,152.9 296.45,152.9 297.95,151.4 297.95,148.6 296.325,146.975 295.532,146.975 295.086,146.528 295.086,145.728 R6.1@294.957,145.6 294.945,145.587 294.945,144.32 C7.1@293.85,143.225
NetC15_1: C15.1 R23.2 | length 2.3
  Top Layer w0.8: R23.2@333.775,80.476 R23.2@333.837,80.539
  Top Layer w1: C15.1@333.775,78.266 R23.2@333.775,80.476
NetC15_2: C15.2 J14.1 Q1.3 Q3.2 VD1.2 VD3.1 X2.6 | length 5.4
  Top Layer w1: X2.6@249,43.54 254.207,43.54 254.317,43.65
  other v1: 252.725,34.749 252.725,36.331 230.315,37.676 228.616,37.72 252.725,37.85 254.25,37.85 255.85,37.85 231.95,39.1 231.95,40.65 231.95,42.27 231.99,44.126
NetC16_1: C16.1 R24.2 | length 2.8
  Top Layer w1: C16.1@368.275,53.825 R24.2@368.275,56.599
NetC16_2: C16.2 J16.1 Q2.3 Q4.2 VD2.2 VD4.1 X1.6 | length 7.8
  Top Layer w1: X1.6@346,43.54 352.385,43.54 353.4,42.525
  other v1: 371.125,39.7 372.625,39.7 374.125,39.7 375.95,39.7 377.45,39.7 378.95,39.7 371.125,41.2 372.625,41.2 374.125,41.2 375.975,41.2 377.475,41.2 378.975,41.2 371.05,42.725 372.55,42.725 374.05,42.725 375.9,42.725 377.4,42.725 378.9,42.725 371.075,44.225 372.575,44.225 374.075,44.225 375.9,44.225 377.4,44.225 378.9,44.225
NetC33_1: C33.1 R64.2 | length 2.7
  Top Layer w1: R64.2@334.65,119.138 C33.1@334.65,121.85
NetC33_2: C33.2 J17.2 Q9.3 Q11.2 VD9.2 VD11.1 X4.4 | length 15.1
  Bottom Layer w1: X4.4@221.175,158.775 221.271,158.871 221.271,161.016 222.161,161.906 229.851,161.906 229.5,162.256 Q11.2@229.5,165.625
  other v1: 272.2,156.5 273.7,156.5 275.225,156.5 276.725,156.5 272.2,157.925 273.7,157.925 275.225,158 276.725,158 272.2,159.425 273.7,159.425 275.225,159.475 276.725,159.475 275.225,159.5 276.725,159.5
NetC34_1: C34.1 R65.2 | length 2.3
  Top Layer w1: R65.2@367,142.926 C34.1@367,145.225
NetC34_2: C34.2 J18.2 Q10.3 Q12.2 VD10.2 VD12.1 X3.4 | length 10.4
  Top Layer w1: X3.4@352.62,159 352.62,160.92 353.55,161.85 360.725,161.85
  other v1: 403.133,156.546 404.633,156.546 403.133,156.571 404.633,156.571 406.158,156.621 407.658,156.621 403.133,158.046 404.633,158.046 406.158,158.121 407.658,158.121 403.133,159.546 404.633,159.546 406.158,159.546 407.658,159.546
NetC43_2: C43.2 P1.1 R53.1 R55.2 TP4.1 | length 16.4
  Bottom Layer w0.98: R53.1@169.174,132.571 R55.2@166.6,132.571 166.299,132.872 C43.2@166.299,135.2 TP4.1@166.299,140.53 171.84,140.53 P1.1@172.01,140.7
NetC44_2: C44.2 P1.2 R54.1 R56.2 TP5.1 | length 22.8
  Bottom Layer w0.8: R54.1@169.174,127.488 R56.2@166.6,127.488 166.299,127.789 C44.2@166.299,130.15 172.14,130.15 174.55,132.56 P1.2@174.55,140.7
NetC46_1: C46.1 R69.1 U16.3 | length 3.5
  Bottom Layer w0.5: U16.3@221.323,147.225 221.336,147.213 221.336,145.675 R69.1@221.336,145.125 221.336,143.738 C46.1@221.348,143.725
NetC47_1: C47.1 R70.2 U16.4 | length 4.3
  Bottom Layer w0.5: R70.2@217.023,149.651 217.036,149.638 221.31,149.638 U16.4@221.323,149.625
NetC47_2: C47.2 R70.1 U16.1 X4.8 | length 17.8
  Bottom Layer w0.5: X4.8@218.635,156.235 218.635,154.103 215.7,151.168 215.7,148.277 216.004,147.973 216.949,147.973 R70.1@217.023,147.899 217.149,148.025 C47.2@219.093,148.025 219.293,148.225 222.855,148.225 223.148,147.932 223.148,147.3 U16.1@223.223,147.225